# Altium PCB PCB_final.PcbDoc
Units mm, origin at the board's own origin, x right, y up, seen from the top; angles counter-clockwise.
Board outline 31.24 x 73.66 mm, 2 copper layers (Top Layer, Bottom Layer); 14 components, 13 nets, 80 pads, 1 vias.
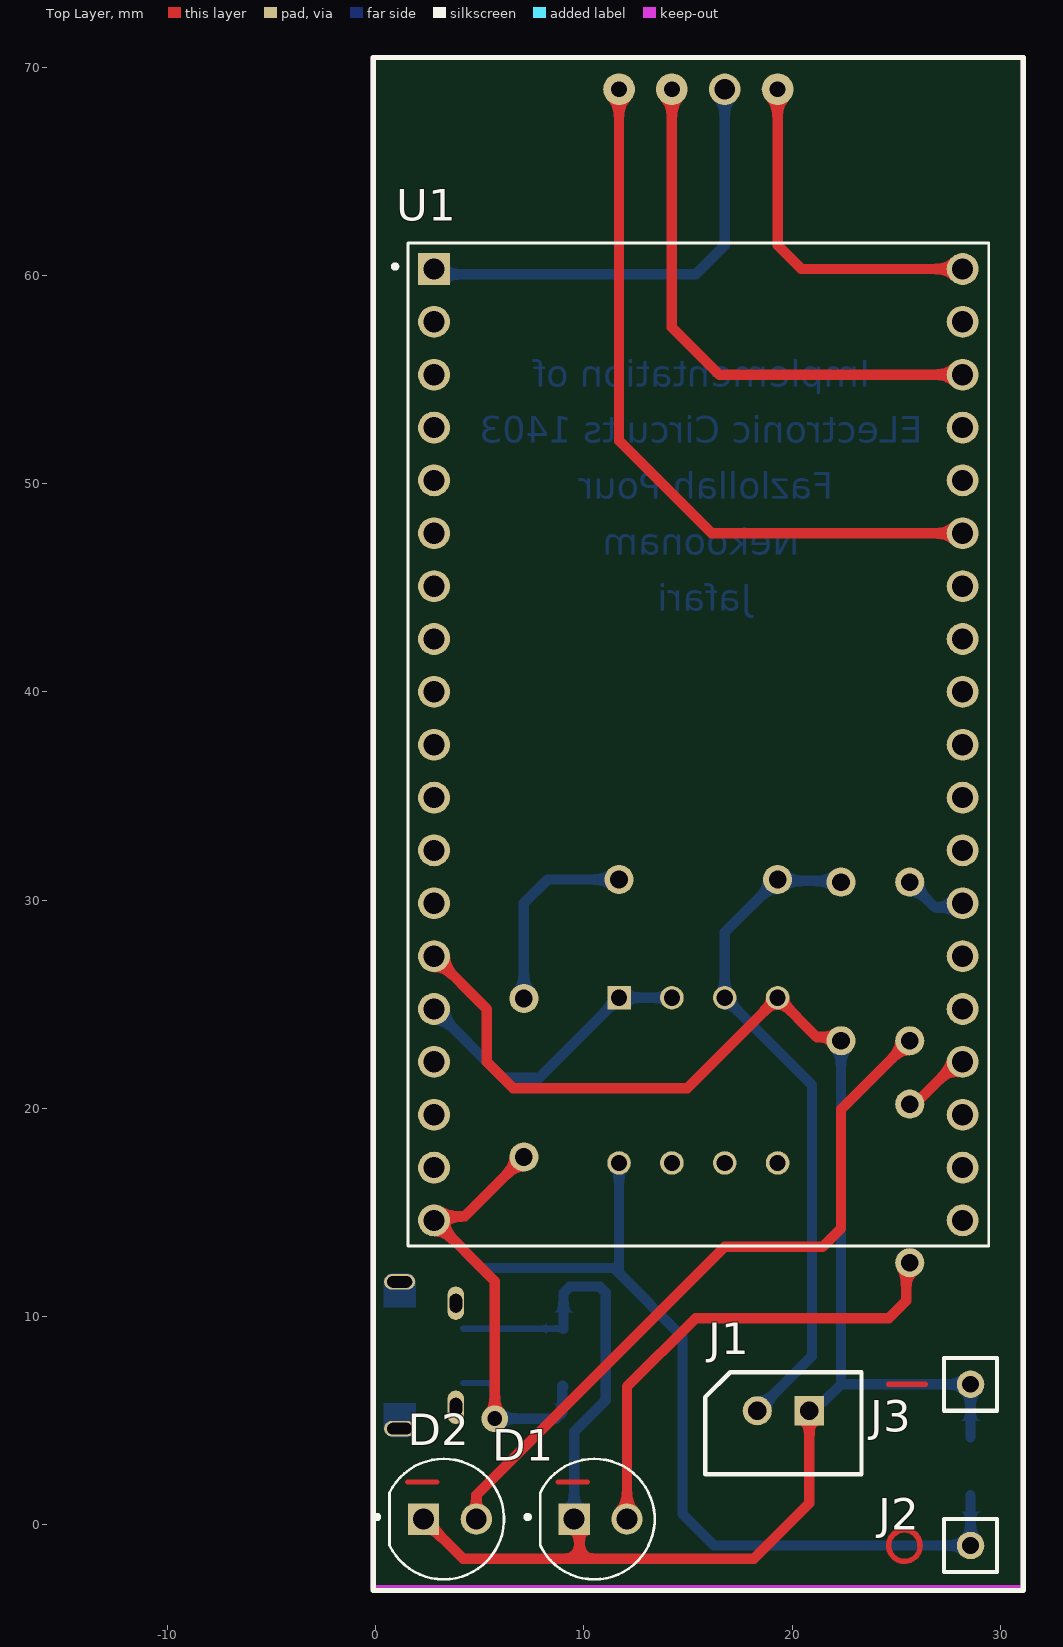
[diagram p0: Top Layer view]
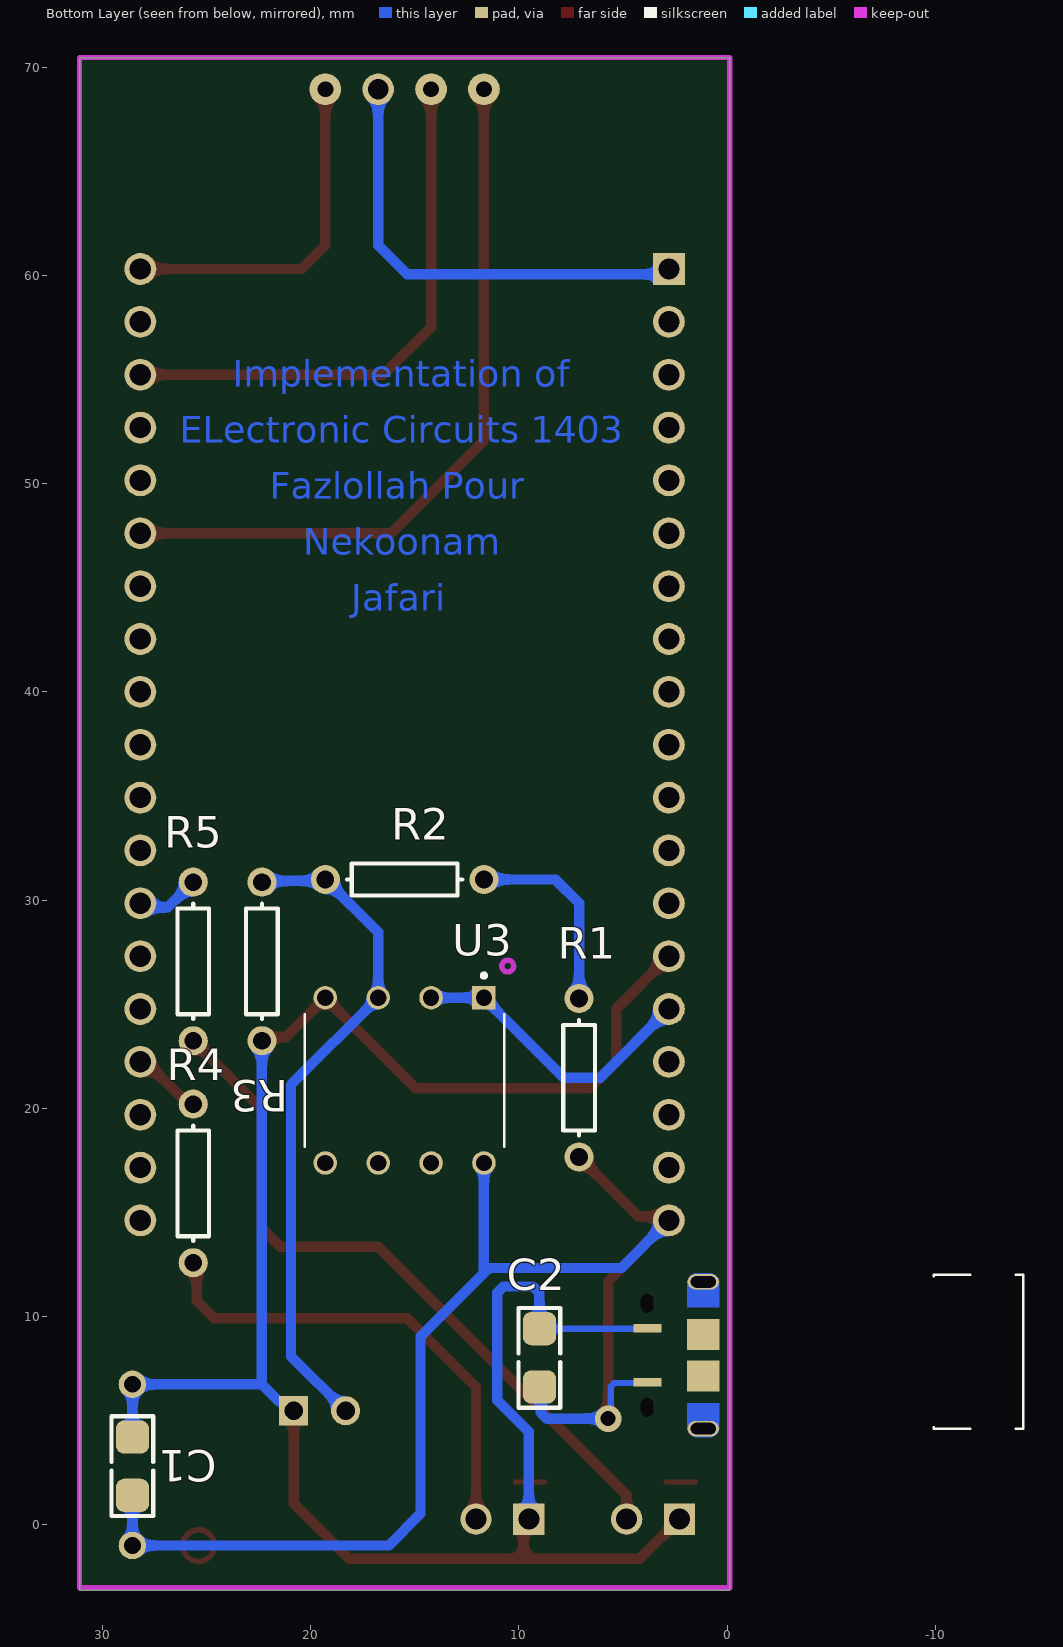
[diagram p1: Bottom Layer view, seen from below]
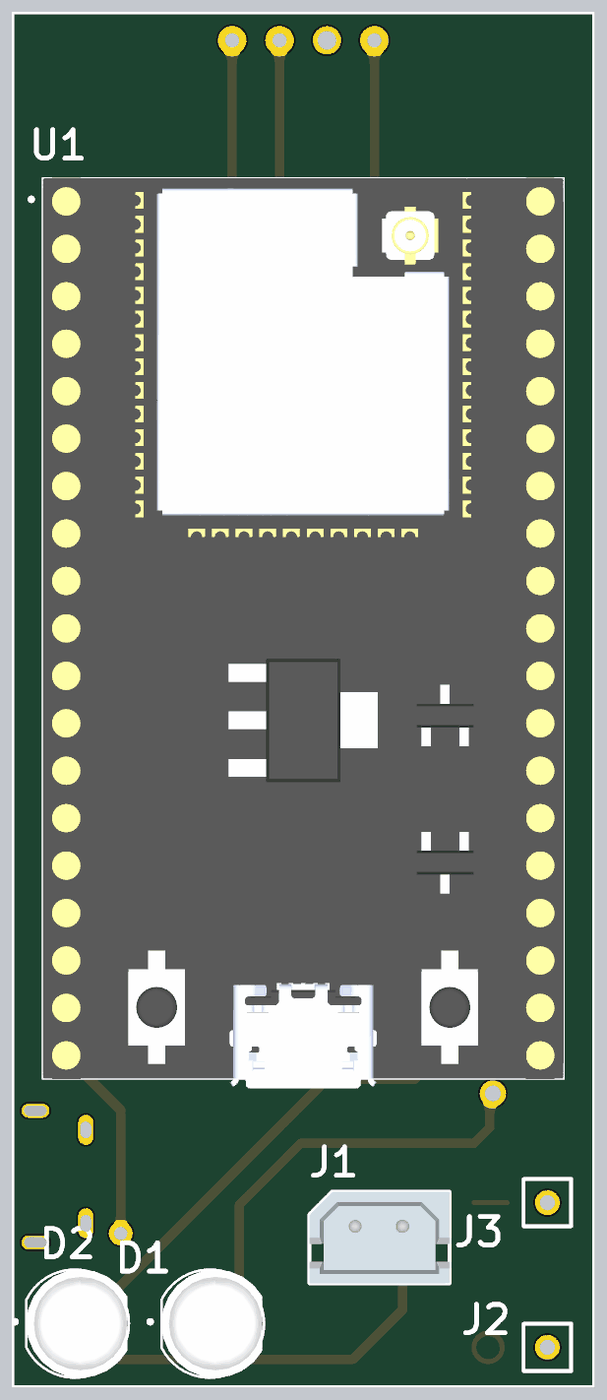
[diagram p2: 3D render of the assembled board from above, using the file's embedded part models]

## Layer stack, top to bottom
Top Solder: solder mask 0.0102, Solder Resist, Dk 3.5
Top Layer: signal copper 0.0356
Dielectric 1: dielectric 0.32, FR-4, Dk 4.8
Bottom Layer: signal copper 0.0356
Bottom Solder: solder mask 0.0102, Solder Resist, Dk 3.5

## Board outline
-0.127,-3.175 -0.127,70.485 31.115,70.485 31.115,-3.175

## Design rules (kind name [scope] priority, off if disabled: settings)
Clearance [All] p1: gap=0.3 ignorepadtopadclearanceinfootprint=FALSE
PolygonConnect [All] p1: connectstyle=Relief reliefconductorwidth=0.254 reliefentries=4 polygonreliefangle="90 Angle" airgapwidth=0.254
RoutingVias [All] p1: holewidth=0.711 width=1.27 viastyle="Through Hole" minholewidth=0.711 minwidth=1.27 maxholewidth=0.711 maxwidth=1.27
SilkToSilkClearance [All] p1: silktosilkclearance=0.35
SolderMaskExpansion [All] p1: expansion=0.102 istentingtop=FALSE
Width [All] p1: maxlimit=1 minlimit=0.2 preferedwidth=0.3 minimp=50.000000 maximp=50.000000 favimp=50.000000
29 further rules are at their usual default settings.

## Components (designator, comment, footprint, x,y, rotation, side; value= is the part's Value field where it differs from the comment)
C1 "100nF-1206" C1206 28.575,2.794 r270 bottom
C2 "100nF-1206" C1206 9.017,8.004 r90 bottom
D1 "151054RS03000" LED_151054RS03000 10.795,0.254 r0 top
D2 "151054RS03000" LED_151054RS03000 3.556,0.254 r0 top
J1 "64600211622" 64600211622 19.578,4.861 r0 top
J2 "TS-101-X-A-1" SAMTEC_TS-101-X-A-1 28.575,-1.016 r0 top
J3 "TS-101-X-A-1" SAMTEC_TS-101-X-A-1 28.575,6.731 r0 top
R1 "Res1" AXIAL-0.3 7.112,21.463 r270 bottom value=2.7K
R2 "Res1" AXIAL-0.3 15.494,30.988 r180 bottom value=68
R3 "Res1" AXIAL-0.3 22.352,27.051 r270 bottom value=3.9K
R4 "Res1" AXIAL-0.3 25.654,16.383 r90 bottom value=1K
R5 "Res1" AXIAL-0.3 25.654,27.051 r90 bottom value=1K
U1 "ESP32-DEVKITC-32U" MODULE_ESP32-DEVKITC-32U 15.494,37.475 r0 top
U3 "LM358PE3" DIP794W45P254L959H508Q8 15.494,21.336 r270 bottom

## Footprints (in the part's own frame and the unit in brackets; to place one, negate y for a bottom-side part, rotate by r counter-clockwise, add the part's x,y. Pads: shape width x height; smd on the part's side, far side on the other; paste and mask are expansions set on the pad)
64600211622 [mm] "2.50mm Male Shrouded Header, 2p"
  rect 1.4x1.4 hole 0.9: 1(1.25,0.6)
  round 1.4 hole 0.9: 2(-1.25,0.6)
  silkscreen extent -3.75,-2.45 3.75,2.45, body extent -3.75,-2.45 3.75,2.45, height 5.95
AXIAL-0.3 [mm] "Axial Device, Thru-Hole; 2 Leads; 0.3 in Pin Spacing"
  round 1.4 hole 0.85: 1(-3.81,0) 2(3.81,0)
  silkscreen extent -2.77,-0.76 2.77,0.76
C1206 [mm] "CHIP Capacitor, 3.2X1.6mm, 1206"
  rrect50% 1.6x1.6 smd paste-0.1 mask+0.075: 1(-1.4,0) 2(1.4,0)
  Top Layer pour cut-out: -0.8,1 -0.8,-1 0.8,-1 0.8,1
  silkscreen extent -2.4,-1 2.4,1, body extent -1.6,-0.8 1.6,0.8, height 1
DIP794W45P254L959H508Q8 [mm]
  rect 1.13x1.13 hole 0.78: 1(-3.97,3.81)
  round 1.13 hole 0.78: 2(-3.97,1.27) 3(-3.97,-1.27) 4(-3.97,-3.81) 5(3.97,-3.81) 6(3.97,-1.27) 7(3.97,1.27) 8(3.97,3.81)
  silkscreen extent -5.13,-4.79 3.18,4.79
LED_151054RS03000 [mm]
  round 1.508 hole 1: A(1.27,0)
  rect 1.508x1.508 / inner round 1.508 / far side rect 1.508x1.508 hole 1: C(-1.27,0)
  silkscreen extent -3.6,-2.9 2.6,2.9, body extent -2.9,-2.9 2.51,2.9, height 12.1
MODULE_ESP32-DEVKITC-32U [mm]
  rect 1.53x1.53 / inner round 1.53 / far side rect 1.53x1.53 hole 1.02: 1(-12.7,22.85)
  round 1.53 hole 1.02: 2(-12.7,20.31) 3(-12.7,17.77) 4(-12.7,15.23) 5(-12.7,12.69) 6(-12.7,10.15) 7(-12.7,7.61) 8(-12.7,5.07) 9(-12.7,2.53) 10(-12.7,-0.01) 11(-12.7,-2.55) 12(-12.7,-5.09) 13(-12.7,-7.63) 14(-12.7,-10.17) 15(-12.7,-12.71) 16(-12.7,-15.25) 17(-12.7,-17.79) 18(-12.7,-20.33) 19(-12.7,-22.87) 20(12.7,-22.87) 21(12.7,-20.33) 22(12.7,-17.79) 23(12.7,-15.25) 24(12.7,-12.71) 25(12.7,-10.17) 26(12.7,-7.63) 27(12.7,-5.09) 28(12.7,-2.55) 29(12.7,-0.01) 30(12.7,2.53) 31(12.7,5.07) 32(12.7,7.61) 33(12.7,10.15) 34(12.7,12.69) 35(12.7,15.23) 36(12.7,17.77) 37(12.7,20.31) 38(12.7,22.85)
  silkscreen extent -14.67,-24.1 13.95,24.1, body extent -13.95,-24.62 13.95,24.13, height 7.85
SAMTEC_TS-101-X-A-1 [mil]
  round 52 hole 32: 01(0,0)
  silkscreen extent -50,-50 50,50

## Part data
C1 C2: library part CAP_SMD_MLCC_1206, "CAP, MLCC, -F, -V, MATERIAL, -%, 0201", ASSEMBLY=ASSEMBLY, MANF=-, MANF_P#=MANF_PART#, PARAM="-, -%", PARAM2=-V, Price="100= 1$"
D1 D2: "Red 623nm LED Indication - Discrete 1.9V Radial", Package="Radial Wurth Elektronik", Availability="In Stock", Check_prices=https://www.snapeda.com/parts/151054RS03000/Wurth+Elektronik/view-part/?ref=eda, MF="Wurth Elektronik", MP=151054RS03000, Price=None, Purchase-URL=https://pricing.snapeda.com/search/part/151054RS03000/?ref=eda, SnapEDA_Link=https://www.snapeda.com/parts/151054RS03000/Wurth+Elektronik/view-part/?ref=snap
J1: "WR-WTB 2.50mm Male Shrouded Header, 2p", ComponentLink1Description=Manufacturer, ComponentLink1URL=http://www.we-online.de, ComponentLink2Description=Datasheet, ComponentLink2URL=http://katalog.we-online.de/em/datasheet/6460xx11622.pdf, Part Number=64600211622, Pin Number=2, Pitch="2.50 mm", Published Date="June 2017", Publisher="Wurth Elektronik"
J2 J3: "Connector Header Through Hole 1 position", Package=None, Availability=Bad, Check_prices=https://www.snapeda.com/parts/TS-101-T-A-1/Samtec/view-part/4655607/?ref=eda, MF="Samtec Inc.", MP=TS-101-T-A-1, Price=None, SnapEDA_Link=https://www.snapeda.com/parts/TS-101-T-A-1/Samtec/view-part/4655607/?ref=snap
R1 R2 R3 R4 R5: "Resistor", LatestRevisionDate=17-Jul-2002, LatestRevisionNote="Re-released for DXP Platform.", PackageDescription="Axial Device, Thru-Hole; 2 Leads; 0.3 in Pin Spacing", PackageReference=AXIAL-0.3, Published=8-Jun-2000, Publisher="Altium Limited"
U1: "ESP32-WROOM-32UE series Transceiver; 802.11 b/g/n (Wi-Fi, WiFi, WLAN), Bluetooth® Smart Ready 4.x Dual Mode Evaluation Board", Package="CUSTOM-38 ESPRESSIF", Check_prices=https://www.snapeda.com/parts/ESP32-DEVKITC-32U/Espressif+Systems/view-part/?ref=eda, MF="Espressif Systems", MP=ESP32-DEVKITC-32U, SnapEDA_Link=https://www.snapeda.com/parts/ESP32-DEVKITC-32U/Espressif+Systems/view-part/?ref=snap
U3: Package=None, Availability=Unavailable, MP=LM358PE3, Price=None

## Free pads (board coordinates)
  rect 1.35x0.4 smd far side: 1(3.818,6.828) 5(3.818,9.428)
  round 1.508 hole 1: 5(16.764,68.961)
  round 1.524 hole 0.762: 6(14.224,68.961) 7(11.684,68.961) 7(19.304,68.961)
  oval 0.8x1.6 / inner oval 0.8x1.6 / far side round 0 hole 0.6 slot 0.9 at 90 deg: S1(3.843,5.628) S2(3.843,10.628)
  oval 1.5x0.75 hole 0.55 slot 1.2 at 0 deg: S3(1.143,4.603) S6(1.143,11.653)
  rect 1.55x1.5 smd far side: S4(1.143,7.128) S5(1.143,9.128)

## Via types
v1: diameter 1.27, hole 0.711, Top Layer to Bottom Layer, 1 vias

## Nets (pads, with @x,y where several pads share a name; then routed paths per layer and width w, separated by ;. In a path a pad name is that pad's centre, name@x,y a point inside that pad or via, vN(x,y) a via of type N, cw(c..) or ccw(c..) an arc to the next point about the centre after c; other vN are vias at no path point)
+5: C1.2 C2.1 J2.01 pad.1 R1.2 U1.19 U3.8 | length 69
  Top Layer w0.5: v1(5.715,5.08) 5.715,11.684 U1.19 2.991,14.802 4.261,14.802 R1.2
  Bottom Layer w0.3: pad.1@4.199,6.797 5.41,6.797 5.586,6.621 5.586,5.209 v1(5.715,5.08)
  Bottom Layer w0.5: U1.19 5.08,12.319 11.43,12.319 11.684,12.065 ; v1(5.715,5.08) 5.715,5.082 8.655,5.082 8.948,5.375 8.948,6.535 C2.1 C2.1@8.948,6.673 ; U3.8 11.684,12.065 ; C1.2 J2.01 16.256,-1.016 14.732,0.508 14.732,9.017 11.684,12.065
GND: C1.1 C2.2 D1.C D2.C J1.1 J3.01 pad.5@3.818,9.428 R3.2 U1.14 U3.4 | length 100.8
  Top Layer w0.3: J3.01@28.423,6.49 J3.01@28.435,6.477
  Top Layer w0.5: D2.C 4.191,-1.651 9.779,-1.651 ; U1.14@2.984,27.305 U1.14 5.334,24.765 5.334,22.225 6.604,20.955 14.953,20.955 U3.4 21.197,23.413 22.18,23.413 R3.2 ; D1.C 9.779,0 9.779,-1.651 ; J1.1 20.828,1.016 18.161,-1.651 9.779,-1.651
  Bottom Layer w0.3: pad.5@4.199,9.397 6.222,9.397 6.229,9.404 C2.2
  Bottom Layer w0.5: C2.2 9.017,11.137 9.31,11.43 10.756,11.43 11.049,11.137 11.049,5.969 9.525,4.445 D1.C ; J1.1 21.278,5.911 21.532,5.911 22.352,6.731 J3.01 C1.1 ; 22.352,6.985 R3.2
NetD1_A: D1.A R4.1 | length 23.4
  Top Layer w0.5: D1.A 12.065,6.604 15.367,9.906 24.638,9.906 25.482,10.75 25.482,12.401 R4.1
NetD2_A: D2.A R5.1 | length 34.4
  Top Layer w0.5: D2.A 4.826,1.397 16.764,13.335 21.463,13.335 22.352,14.224 22.352,19.939 R5.1
NetJ1_2: J1.2 R2.1 R3.1 U3.3 | length 32.5
  Bottom Layer w0.5: J1.2 20.955,8.088 20.955,21.115 U3.3 16.764,28.448 R2.1 19.367,30.924 22.288,30.924 R3.1
NetR1_1: R1.1 R2.2 | length 9.6
  Bottom Layer w0.5: R1.1 7.112,29.845 8.255,30.988 R2.2
NetR4_2: R4.2 U1.23 | length 3.4
  Top Layer w0.5: R4.2 25.898,20.193 26.296,20.591 26.306,20.591 27.94,22.225 U1.23
NetR5_2: R5.2 U1.26 | length 3.1
  Bottom Layer w0.5: R5.2 26.867,29.648 27.997,29.648 U1.26
NetU1_1: pad.5@16.764,68.961 U1.1 | length 22.1
  Bottom Layer w0.5: U1.1 3.048,60.071 15.367,60.071 16.764,61.468 pad.5@16.764,68.961
NetU1_15: U1.15 U3.1 U3.2 | length 14.4
  Bottom Layer w0.5: U1.15 6.096,21.463 7.841,21.463 U3.1 U3.2
NetU1_33: pad.7@11.684,68.961 U1.33 | length 35.2
  Top Layer w0.5: pad.7@11.684,68.961 11.684,52.07 16.129,47.625 U1.33
NetU1_36: pad.6 U1.36 | length 26.3
  Top Layer w0.5: pad.6 14.224,57.531 16.51,55.245 U1.36
NetU1_38: pad.7@19.304,68.961 U1.38 | length 16.9
  Top Layer w0.5: pad.7@19.304,68.961 19.304,61.468 20.447,60.325 U1.38
pads on no net: U1.2 U1.3 U1.4 U1.5 U1.6 U1.7 U1.8 U1.9 U1.10 U1.11 U1.12 U1.13 U1.16 U1.17 U1.18 U1.20 U1.21 U1.22 U1.24 U1.25 U1.27 U1.28 U1.29 U1.30 U1.31 U1.32 U1.34 U1.35 U1.37 U3.5 U3.6 U3.7
copper on no net: | length 12.5
  Top Layer w0.254: 1.524,2.032 2.921,2.032 ; 8.763,2.032 10.16,2.032 ; 24.638,-1.016 ccw(c25.4,-1.016) 25.4,-1.778 ; 24.638,6.731 26.416,6.731 ; 24.765,-0.635 cw(c25.4,-1.016) 26.141,-1.016 ; 26.162,-1.016 ccw(c25.4,-1.016) 26.162,-1.016

## Keep-outs
Bottom Layer:
  circle w0.254: c10.541,26.827 r0.284
  lines w0.254: 10.541,26.543 cw(c10.541,26.827) 10.825,26.827
Keep-Out Layer:
  lines w0.254: -0.127,-3.048 -0.127,70.485 31.115,70.485 31.115,-3.048 -0.127,-3.048

## Other copper
Bottom Layer:
  region: 0.368,5.828 0.368,4.683 0.369,4.657 0.371,4.631 0.374,4.605 0.379,4.579 0.385,4.554 0.392,4.528 0.401,4.504 0.411,4.48 0.422,4.456 0.435,4.433 0.449,4.411 0.463,4.389 0.479,4.368 0.496,4.348 0.514,4.329 0.533,4.311 0.553,4.294 0.574,4.278 0.596,4.264 0.618,4.25 0.641,4.237 0.665,4.226 0.689,4.216 0.713,4.207 0.739,4.2 0.764,4.194 0.79,4.189 0.816,4.186 0.842,4.184 0.868,4.183 1.418,4.183 1.444,4.184 1.47,4.186 1.496,4.189 1.522,4.194 1.547,4.2 1.573,4.207 1.597,4.216 1.621,4.226 1.645,4.237 1.668,4.25 1.69,4.264 1.712,4.278 1.733,4.294 1.753,4.311 1.772,4.329 1.79,4.348 1.807,4.368 1.823,4.389 1.837,4.411 1.851,4.433 1.864,4.456 1.875,4.48 1.885,4.504 1.894,4.528 1.901,4.554 1.907,4.579 1.912,4.605 1.915,4.631 1.917,4.657 1.918,4.683 1.918,5.828
  region: 1.917,11.599 1.915,11.625 1.912,11.651 1.907,11.677 1.901,11.702 1.894,11.728 1.885,11.752 1.875,11.776 1.864,11.8 1.851,11.823 1.837,11.845 1.823,11.867 1.807,11.888 1.79,11.908 1.772,11.927 1.753,11.945 1.733,11.962 1.712,11.978 1.69,11.992 1.668,12.006 1.645,12.019 1.621,12.03 1.597,12.04 1.573,12.049 1.547,12.056 1.522,12.062 1.496,12.067 1.47,12.07 1.444,12.072 1.418,12.073 0.868,12.073 0.842,12.072 0.816,12.07 0.79,12.067 0.764,12.062 0.739,12.056 0.713,12.049 0.689,12.04 0.665,12.03 0.641,12.019 0.618,12.006 0.596,11.992 0.574,11.978 0.553,11.962 0.533,11.945 0.514,11.927 0.496,11.908 0.479,11.888 0.463,11.867 0.449,11.845 0.435,11.823 0.422,11.8 0.411,11.776 0.401,11.752 0.392,11.728 0.385,11.702 0.379,11.677 0.374,11.651 0.371,11.625 0.369,11.599 0.368,11.573 0.368,10.428 1.918,10.428 1.918,11.573
  text "Implementation of" at 23.749,54.239 h2.2
  text "ELectronic Circuits 1403" at 26.289,51.532 h2.2
  text "Fazlollah Pour" at 21.968,48.847 h2.2
  text "Nekoonam" at 20.366,46.163 h2.2
  text "Jafari" at 18.06,43.458 h2.2

## Silkscreen, mask and mechanical layers (free items; w line width, h text height)
Top Overlay:
  the board outline again, w0.254
Bottom Overlay:
  lines w0.127: -13.884,4.594 -14.239,4.594 -14.239,11.994 -13.884,11.994 ; -11.694,4.594 -9.939,4.594 -9.939,4.674 ; -11.694,11.994 -9.939,11.994 -9.939,11.914
Bottom Paste:
  region: 0.368,5.828 0.368,4.683 0.369,4.657 0.371,4.631 0.374,4.605 0.379,4.579 0.385,4.554 0.392,4.528 0.401,4.504 0.411,4.48 0.422,4.456 0.435,4.433 0.449,4.411 0.463,4.389 0.479,4.368 0.496,4.348 0.514,4.329 0.533,4.311 0.553,4.294 0.574,4.278 0.596,4.264 0.618,4.25 0.641,4.237 0.665,4.226 0.689,4.216 0.713,4.207 0.739,4.2 0.764,4.194 0.79,4.189 0.816,4.186 0.842,4.184 0.868,4.183 1.418,4.183 1.444,4.184 1.47,4.186 1.496,4.189 1.522,4.194 1.547,4.2 1.573,4.207 1.597,4.216 1.621,4.226 1.645,4.237 1.668,4.25 1.69,4.264 1.712,4.278 1.733,4.294 1.753,4.311 1.772,4.329 1.79,4.348 1.807,4.368 1.823,4.389 1.837,4.411 1.851,4.433 1.864,4.456 1.875,4.48 1.885,4.504 1.894,4.528 1.901,4.554 1.907,4.579 1.912,4.605 1.915,4.631 1.917,4.657 1.918,4.683 1.918,5.828
  region: 1.917,11.599 1.915,11.625 1.912,11.651 1.907,11.677 1.901,11.702 1.894,11.728 1.885,11.752 1.875,11.776 1.864,11.8 1.851,11.823 1.837,11.845 1.823,11.867 1.807,11.888 1.79,11.908 1.772,11.927 1.753,11.945 1.733,11.962 1.712,11.978 1.69,11.992 1.668,12.006 1.645,12.019 1.621,12.03 1.597,12.04 1.573,12.049 1.547,12.056 1.522,12.062 1.496,12.067 1.47,12.07 1.444,12.072 1.418,12.073 0.868,12.073 0.842,12.072 0.816,12.07 0.79,12.067 0.764,12.062 0.739,12.056 0.713,12.049 0.689,12.04 0.665,12.03 0.641,12.019 0.618,12.006 0.596,11.992 0.574,11.978 0.553,11.962 0.533,11.945 0.514,11.927 0.496,11.908 0.479,11.888 0.463,11.867 0.449,11.845 0.435,11.823 0.422,11.8 0.411,11.776 0.401,11.752 0.392,11.728 0.385,11.702 0.379,11.677 0.374,11.651 0.371,11.625 0.369,11.599 0.368,11.573 0.368,10.428 1.918,10.428 1.918,11.573
Bottom Solder:
  region: 0.268,5.928 0.268,4.583 0.269,4.557 0.271,4.531 0.274,4.505 0.279,4.479 0.285,4.454 0.292,4.428 0.301,4.404 0.311,4.38 0.322,4.356 0.335,4.333 0.349,4.311 0.363,4.289 0.379,4.268 0.396,4.248 0.414,4.229 0.433,4.211 0.453,4.194 0.474,4.178 0.496,4.164 0.518,4.15 0.541,4.137 0.565,4.126 0.589,4.116 0.613,4.107 0.639,4.1 0.664,4.094 0.69,4.089 0.716,4.086 0.742,4.084 0.768,4.083 1.518,4.083 1.544,4.084 1.57,4.086 1.596,4.089 1.622,4.094 1.647,4.1 1.673,4.107 1.697,4.116 1.721,4.126 1.745,4.137 1.768,4.15 1.79,4.164 1.812,4.178 1.833,4.194 1.853,4.211 1.872,4.229 1.89,4.248 1.907,4.268 1.923,4.289 1.937,4.311 1.951,4.333 1.964,4.356 1.975,4.38 1.985,4.404 1.994,4.428 2.001,4.454 2.007,4.479 2.012,4.505 2.015,4.531 2.017,4.557 2.018,4.583 2.018,5.928
  region: 2.017,11.699 2.015,11.725 2.012,11.751 2.007,11.777 2.001,11.802 1.994,11.828 1.985,11.852 1.975,11.876 1.964,11.9 1.951,11.923 1.937,11.945 1.923,11.967 1.907,11.988 1.89,12.008 1.872,12.027 1.853,12.045 1.833,12.062 1.812,12.078 1.79,12.092 1.768,12.106 1.745,12.119 1.721,12.13 1.697,12.14 1.673,12.149 1.647,12.156 1.622,12.162 1.596,12.167 1.57,12.17 1.544,12.172 1.518,12.173 0.768,12.173 0.742,12.172 0.716,12.17 0.69,12.167 0.664,12.162 0.639,12.156 0.613,12.149 0.589,12.14 0.565,12.13 0.541,12.119 0.518,12.106 0.496,12.092 0.474,12.078 0.453,12.062 0.433,12.045 0.414,12.027 0.396,12.008 0.379,11.988 0.363,11.967 0.349,11.945 0.335,11.923 0.322,11.9 0.311,11.876 0.301,11.852 0.292,11.828 0.285,11.802 0.279,11.777 0.274,11.751 0.271,11.725 0.269,11.699 0.268,11.673 0.268,10.328 2.018,10.328 2.018,11.673
Mechanical 13:
  lines w0.127: -0.307,4.428 -0.307,11.828 ; -0.307,4.428 3.993,4.428 3.993,11.828 -0.307,11.828 ; -0.307,4.428 -1.007,4.428 -1.007,4.103 -1.537,4.103 -1.537,12.153 -1.007,12.153 -1.007,11.828 -0.307,11.828
Mechanical 15:
  lines w0.05: -1.787,3.853 4.743,3.853 4.743,12.403 -1.787,12.403 -1.787,3.853